# Altium PCB LTE GNSS Tracker.PcbDoc (part 4 of 5)
Units mil, origin at the board's own origin, x right, y up, seen from the top; angles counter-clockwise.
Board outline 2165.35 x 4361.93 mil, 4 copper layers (Top Layer, Layer 1, Layer 2, Bottom Layer), stack 38.189 mil thick; 158 components, 113 nets, 617 pads, 1197 vias.
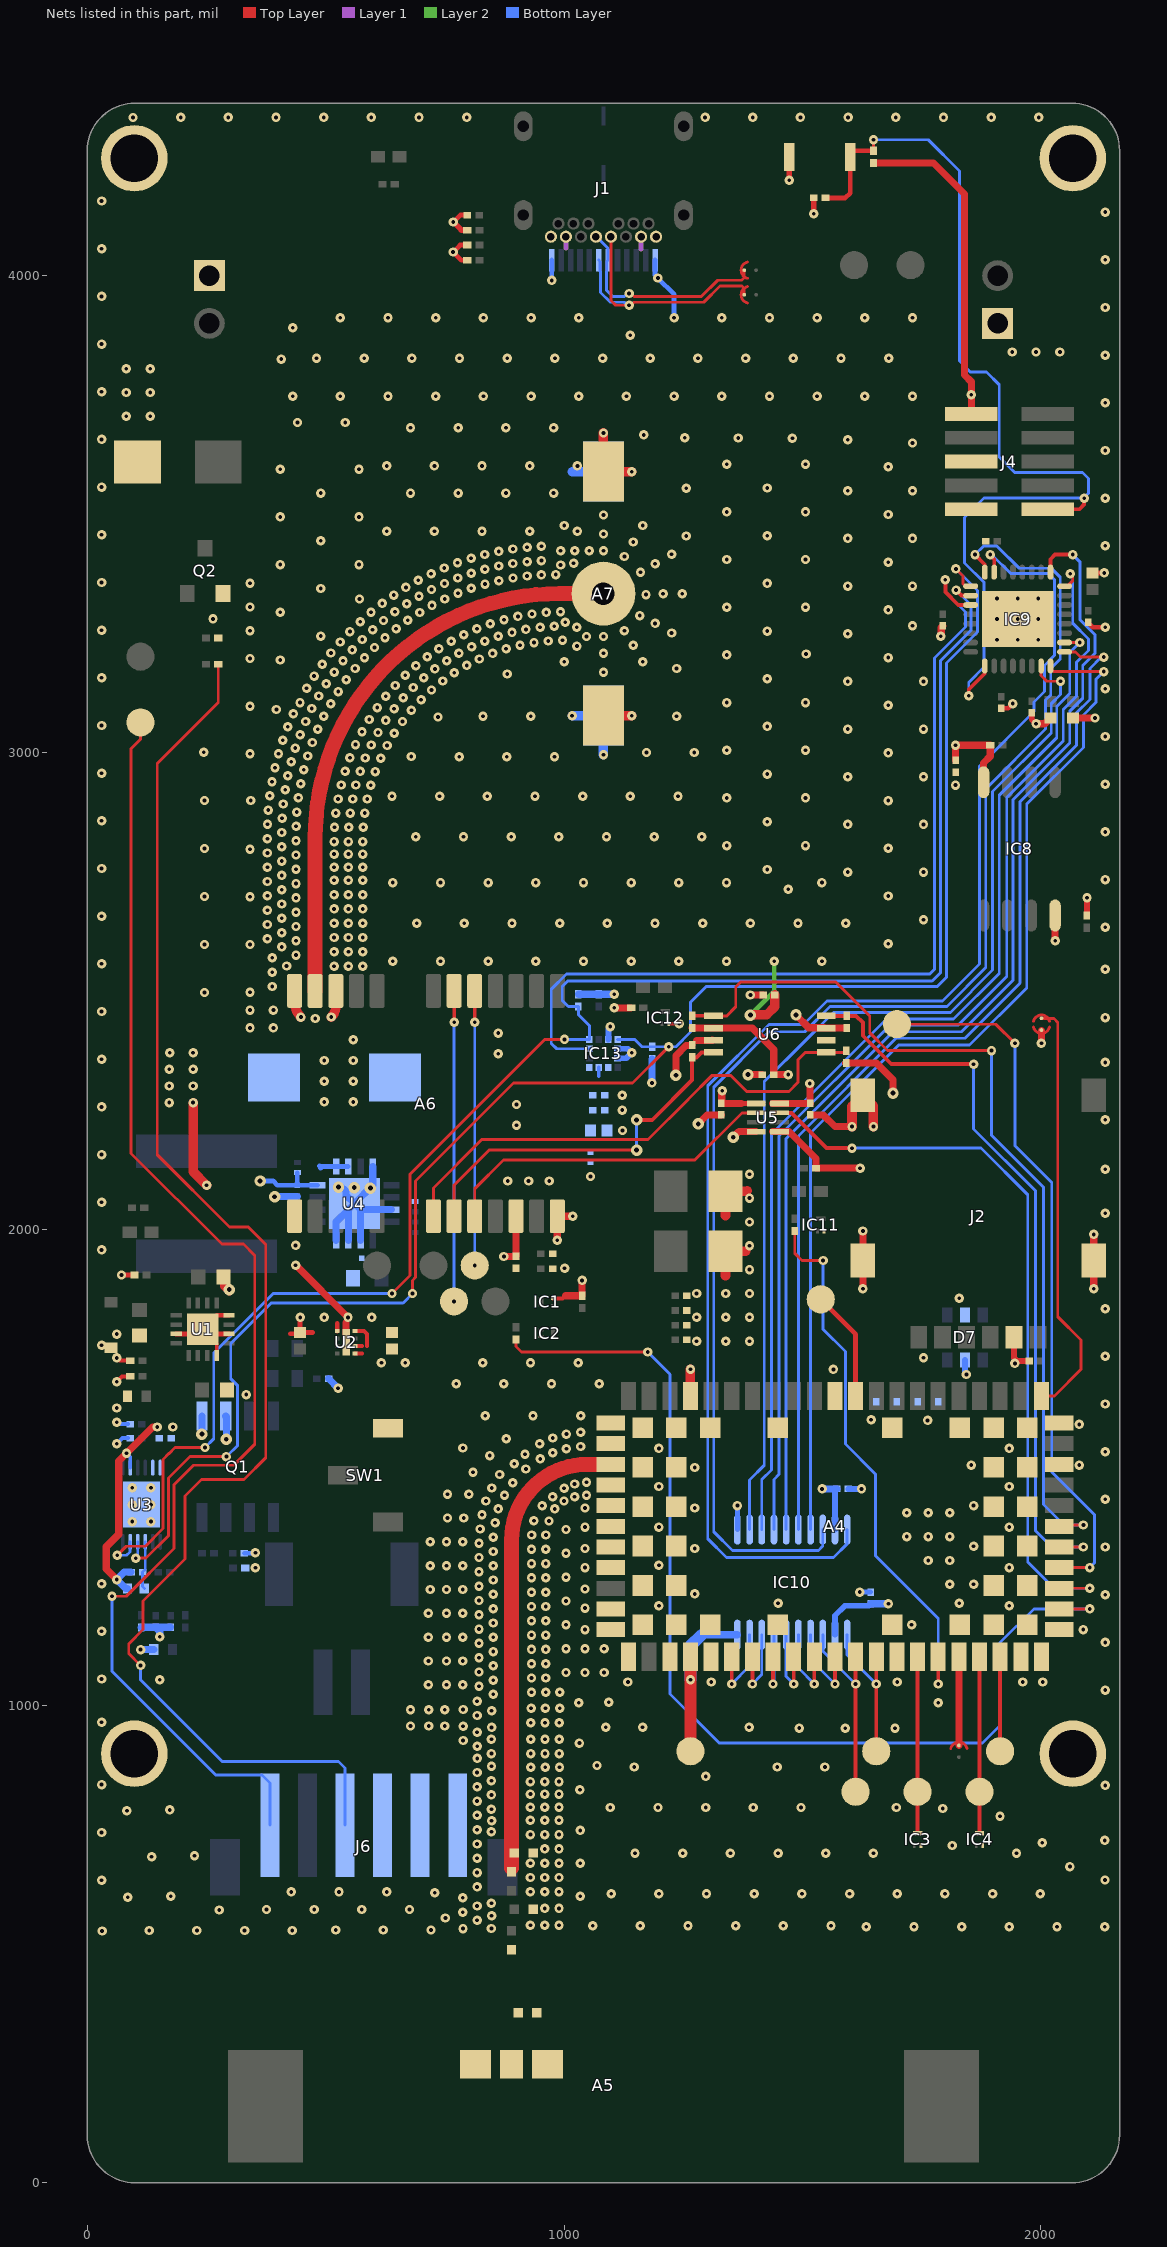
[diagram p4: the nets of this part, all layers, seen from the top]

## Via types
v1: diameter 19.68, hole 7.87, Top Layer to Bottom Layer, 1112 vias
v2: diameter 19.68, hole 7.87, Top Layer to Bottom Layer, tented both sides, 56 vias
v3: diameter 24, hole 10, Top Layer to Bottom Layer, 29 vias

## Nets (pads, with @x,y where several pads share a name; then routed paths per layer and width w, separated by ;. In a path a pad name is that pad's centre, name@x,y a point inside that pad or via, vN(x,y) a via of type N, cw(c..) or ccw(c..) an arc to the next point about the centre after c; other vN are vias at no path point) (continued)
I2C_SCL: (continued)
  Bottom Layer w6: v1(62.85,1316) 82.53,1316 89.77,1323.24 89.77,1343.94 U3.11@90.13,1344.3 ; v1(246.85,1542) 265.16,1560.32 265.16,1740.25 390.11,1865.2 v2(639.03,1865.2) ; v1(1000.93,2398.03) IC13.1@1053.15,2398.03 1053.15,2426.74 1030.15,2449.75 R28.1@1030.15,2467.2 1008.96,2467.2 996.29,2479.88 996.29,2508.98 1007.66,2520.36 1772.12,2520.36 1789.71,2537.94 1789.71,3192.23 1853.85,3256.37 1853.85,3309 v1(1822.35,3340.5)
I2C_SDA: IC9.1 IC13.4 R29.1 U3.10 | length 3700.9
  Top Layer w6: v1(101.85,1310) 123.1,1310.01 168,1354.96 170,1356.96 170,1477.91 215.09,1523 v1(291.85,1523) ; v2(682.02,1865) 682.02,1892.62 688.48,1899.09 688.48,2101.25 894.1,2306.86 1143.56,2306.86 v1(1219.49,2382.8) ; v1(1821.85,3385) 1836.85,3370 1836.85,3353.63 1841.85,3348.63 IC9.1@1852.97,3348.63
  Bottom Layer w6: v1(101.85,1310) 101.85,1313.7 105.88,1317.73 U3.10@105.88,1344.3 ; v1(291.85,1523) 315.43,1546.58 315.43,1671.66 300.94,1686.15 300.94,1760.47 385.98,1845.52 662.54,1845.52 v2(682.02,1865) ; IC13.4@1112.2,2398.03 1148.17,2398.03 1163.41,2382.8 R29.1@1184.55,2382.8 v1(1219.49,2382.8) 1234.52,2382.8 1265.17,2413.45 1265.17,2476.04 1298.18,2509.04 1782.9,2509.04 1802.15,2528.29 1802.15,3187.4 1867.5,3252.75 1867.5,3339.35 v1(1821.85,3385)
LTE_1V8_CTS: A4.11 IC10.4 | length 181.6
  Top Layer w8: v1(1568.26,1046.06) A4.11@1568.26,1103.13
  Bottom Layer w6: IC10.4@1517.08,1149.38 1517.08,1097.24 v1(1568.26,1046.06)
LTE_1V8_DCD: A4.8 IC10.7 | length 161.2
  Top Layer w8: v1(1438.34,1046.06) A4.8@1438.34,1103.13
  Bottom Layer w6: v1(1438.34,1046.06) 1440.31,1048.03 IC10.7@1440.31,1149.38
LTE_1V8_DSR: A4.6 IC10.9 | length 175.9
  Top Layer w8: v1(1351.72,1046.06) A4.6@1351.73,1103.13
  Bottom Layer w6: v1(1351.72,1046.06) 1389.13,1083.47 IC10.9@1389.13,1149.38
LTE_1V8_DTR: A4.9 IC10.6 | length 166.9
  Top Layer w8: v1(1481.65,1046.06) A4.9@1481.65,1103.13
  Bottom Layer w6: IC10.6@1465.9,1149.39 1465.9,1061.81 v1(1481.65,1046.06)
LTE_1V8_RI: A4.7 IC10.8 | length 168.6
  Top Layer w8: v1(1395.03,1046.06) A4.7@1395.04,1103.13
  Bottom Layer w6: v1(1395.03,1046.06) 1414.72,1065.75 IC10.8@1414.72,1149.38
LTE_1V8_RTS: A4.10 IC10.5 | length 174.3
  Top Layer w8: v1(1524.95,1046.06) A4.10@1524.96,1103.13
  Bottom Layer w6: IC10.5@1491.49,1149.38 1491.49,1079.52 v1(1524.95,1046.06)
LTE_1V8_RX: A4.13 IC10.1 TP5.1 | length 326.8
  Top Layer w8: TP5.1@1654.87,904.93 v1(1654.87,1046.06) A4.13@1654.88,1103.13
  Bottom Layer w6: IC10.1@1593.85,1149.38 1593.85,1107.08 v1(1654.87,1046.06)
LTE_1V8_TX: A4.12 IC10.3 TP6.1 | length 415
  Top Layer w8: TP6.1@1611.57,820 A4.12@1611.57,1103.13
  Bottom Layer w6: IC10.3@1542.67,1149.38 1543,1149.06 1543,1114.63 v1(1611.57,1046.06)
LTE_3V3_CTS: IC9.16 IC10.17 | length 2261.2
  Top Layer w6: IC9.16@2020.29,3181.31 2020.29,3175.5 2026.29,3169.5 v1(2131.85,3169.5)
  Bottom Layer w6: IC10.17@1517.08,1369.86 1517.08,2201.58 1701.94,2386.44 1850.63,2386.44 1970.37,2506.18 1970.37,2891.78 2089.21,3010.62 2089.21,3078.52 2115.85,3105.15 2115.85,3153.5 v1(2131.85,3169.5)
LTE_3V3_DCD: IC9.25 IC10.15 | length 2495.2
  Top Layer w6: IC9.25@2020.09,3378.36 IC9.25@2020.29,3378.16
  Top Layer w8: IC9.25@2020.09,3378.36 2020.09,3405.21 2029.88,3415 v1(2066.85,3415)
  Bottom Layer w6: IC10.15@1465.9,1369.86 1465.9,2189.99 1689.94,2414.03 1833.84,2414.03 1941.85,2522.04 1941.85,2900.74 2060.65,3019.54 2060.65,3086.3 2087.85,3113.5 2087.85,3182 2113.85,3208 2113.85,3247 2081.85,3279 2081.85,3400 v1(2066.85,3415)
LTE_3V3_DSR: IC9.15 IC10.12 | length 2258.9
  Top Layer w6: IC9.15@2000.61,3181.31 2000.61,3161.24 2012.45,3149.4 v1(2041.25,3149.4)
  Bottom Layer w6: IC10.12@1389.13,1369.86 1389.13,1474.13 1420,1505 1420,2309.51 1507.92,2397.43 1565.23,2454.74 1810.4,2454.74 1899,2543.34 1899,2918.13 2021.96,3041.09 2021.96,3101.96 2041.25,3121.25 v1(2041.25,3149.4)
LTE_3V3_DTR: IC9.24 IC10.14 | length 2416.3
  Top Layer w6: IC9.24@2049.82,3348.63 2055.48,3348.63 2066.85,3360 2066.85,3370 v1(2061.85,3375)
  Bottom Layer w6: IC10.14@1440.31,1369.86 1440.31,1475.31 1451,1486 1451,2195.18 1683.7,2427.88 1826.13,2427.88 1928.56,2530.31 1928.56,2905.62 2047.15,3024.21 2047.15,3090 2074.95,3117.8 2074.95,3189.1 2099.85,3214 2099.85,3238 2066.85,3271 2066.85,3370 v1(2061.85,3375)
LTE_3V3_RI: IC9.18 IC10.13 | length 2251.6
  Top Layer w6: IC9.18@2049.82,3230.52 v1(2081.85,3230.52)
  Bottom Layer w6: IC10.13@1414.72,1369.86 1414.72,1474.72 1435,1495 1435,2199.76 1676.08,2440.83 1816.98,2440.83 1912.69,2536.55 1912.69,2910.09 2033.46,3030.85 2033.46,3096.51 2060.65,3123.7 2060.65,3209.32 v1(2081.85,3230.52)
LTE_3V3_RTS: IC9.17 IC10.16 | length 2269.4
  Top Layer w6: IC9.17@2049.82,3210.84 2072.63,3210.84 2083.47,3200 v1(2131.85,3200)
  Bottom Layer w6: IC10.16@1491.49,1369.86 1491.49,2195.5 1696.53,2400.54 1840.96,2400.54 1956.43,2516.01 1956.43,2896.49 2074.95,3015 2074.95,3083.1 2102.95,3111.1 2102.95,3176.1 2126.85,3200 v1(2131.85,3200)
LTE_3V3_RX: IC9.31 IC10.20 | length 3041.9
  Top Layer w8: v1(1893.85,3415) 1893.85,3413.26 1902.18,3404.92 IC9.31@1902.18,3378.16
  Bottom Layer w6: IC10.20@1593.85,1369.86 1593.85,1340.04 1565,1311.19 1341,1311.19 1301.33,1350.85 1301.33,2300.9 1429.79,2429.35 1502.1,2429.35 1551.41,2478.67 1793.85,2478.67 1871.2,2556.01 1871.2,2970.95 1986,3085.75 1986,3106 2007.55,3127.55 2007.55,3182.4 2028.85,3203.7 2028.85,3362.07 2015.92,3375 1936.85,3375 v1@1896.85,3415
LTE_3V3_TX: IC9.32 IC10.18 | length 3033.2
  Top Layer w8: v1(1861.85,3415) 1882.5,3394.35 IC9.32@1882.5,3378.16
  Bottom Layer w6: IC10.18@1542.67,1369.86 1542.67,1335.2 1533.66,1326.19 1353,1326.19 1313.86,1365.32 1313.86,2297.87 1430.02,2414.03 1504.95,2414.03 1558.12,2467.2 1802.92,2467.2 1884.64,2548.92 1884.64,2923.59 2009.87,3048.82 2009.87,3109.87 2020.75,3120.75 2020.75,3175.9 2040.85,3196 2040.85,3367.36 2021.96,3386.24 1954.83,3386.24 1907.75,3433.32 1880.17,3433.32 v1(1861.85,3415)
LTE_GPIO1: A4.16 R31.1 | length 1157.7
  Top Layer w6: R31.1@1484,1996.3 1484,1949.59 1499.29,1934.29 v2(1543.33,1934.29)
  Top Layer w8: v1(1784.8,1046.06) A4.16@1784.8,1103.13
  Bottom Layer w6: v2(1543.33,1934.29) 1543.33,1790.16 1590,1743.48 1590,1549.18 1653.31,1485.87 1653.31,1314.99 1784.8,1183.5 v1(1784.8,1046.06)
LTE_PWRON: A4.15 IC3.D TP4.1 | length 370.3
  Top Layer w8: IC3.D@1741.49,732.8 TP4.1@1741.49,820 A4.15@1741.49,1103.13
LTE_RESET: A4.18 IC4.D TP3.1 | length 370.3
  Top Layer w8: IC4.D@1871.41,732.8 TP3.1@1871.41,820 A4.18@1871.41,1103.13
MCU_RESET: C39.2 IC9.9 J4.10 R24.1 S1.1 | length 2166.5
  Top Layer w6: R24.1@1649.01,4262.04 v1(1649.1,4285)
  Top Layer w8: v1(1848.85,3119) 1848.85,3132 1882.5,3165.65 IC9.9@1882.5,3181.31 ; J4.10@2014.3,3510 2080.99,3510 2090.9,3519.92 v2(2090.9,3533.32)
  Top Layer w10: C39.2@1548.39,4163.14 1589.95,4163.09 1600.16,4173.3 1600.16,4253.94 1608.17,4261.95 R24.1@1649.01,4262.04
  Bottom Layer w6: v1(1649.1,4285) 1763.77,4285 1829.17,4219.6 1829.17,3820.82 1851.89,3798.09 1885.76,3798.09 1912.69,3771.16 1912.69,3619.8 1945.22,3587.26 2087.46,3587.26 2100.23,3574.49 2100.23,3543.68 2090.9,3534.35 v2(2090.9,3533.32) 1880.66,3533.32 1840.23,3492.9 1840.23,3397.61 1880.85,3357 1880.85,3179 1848.85,3147 v1(1848.85,3119)
MOTOR+: J6.3 R13.2 | length 3107.2
  Top Layer w6: v1(111.85,1085) 86.85,1110 86.85,1130 116.85,1160 116.85,1220 205,1308.15 205,1440.35 239.49,1474.84 328.66,1474.84 374.35,1520.53 374.35,1967.77 337.68,2004.44 298.48,2004.44 146.85,2156.08 146.85,2976.85 274.69,3104.69 R13.2@274.69,3185.05
  Bottom Layer w6: v1(111.85,1085) 111.85,1054.98 283.06,883.77 526.71,883.77 540.63,869.85 J6.3@540.63,750
NetA4_17: A4.17 SB1.2 | length 185.9
  Top Layer w15: SB1.2@1828.11,917.23 1828.11,924.1 A4.17@1828.11,1103.13
NetA4_19: A4.19 TP11.1 | length 198.2
  Top Layer w8: TP11.1@1914.72,904.93 A4.19@1914.72,1103.13
NetA4_25: A4.25 TP9.1 | length 1501.2
  Top Layer w6: TP9.1@1698.18,2430 1905.62,2430 v2(1945.71,2389.91) ; A4.25@2038.74,1290.14 2038.78,1290.19 v2(2102.43,1290.19)
  Bottom Layer w6: v2(1945.71,2389.91) 1945.71,2175.12 2022.93,2097.9 2022.93,1490.39 2112.98,1400.34 2112.98,1300.73 v2(2102.43,1290.19)
NetA4_33: A4.33 SB4.1 | length 891.4
  Top Layer w6: A4.33@2001.33,1650.37 2028.43,1650.37 2084.11,1706.05 2084.11,1767.8 2035.61,1816.29 2035.61,2433.69 2027.37,2441.93 SB4.1@2003.03,2441.93 ; SB4.1@2001.33,2442.3 2001.69,2441.94 SB4.1@2003.02,2441.94
NetA4_42: A4.42 TP10.1 | length 232.9
  Top Layer w10: TP10.1@1538.41,1852.94 1611.57,1779.78 A4.42@1611.57,1650.37
NetA4_56: A4.56 C4.2 R17.2 | length 984.6
  Top Layer w31.5: R17.2@890,660 890,1348.38 cw(c1048.3,1348.38) 1048.3,1506.68 ; 1050.23,1506.68 A4.56@1097.79,1506.67
NetA5_S: A5.S C49.2 L3.2
NetA6_5: A6.5 TP16.1 | length 575.9
  Top Layer w8: v2(812.64,2433.94) A6.5@812.63,2499.74
  Bottom Layer w6: v2(812.63,1923.88) v2(812.64,2433.94)
NetA6_6: A6.6 TP15.1 | length 651.4
  Top Layer w6: A6.6@769.32,2499.74 A6.6@769.58,2499.47
  Top Layer w8: v2(769.58,2433.94) A6.6@769.58,2499.47
  Bottom Layer w6: v2(769.32,1848.51) 769.45,1848.64 769.45,2433.81 v2(769.58,2433.94)